# Altium PCB rev-b1_pod_Pod_PCB.PcbDoc
Units mm, origin at the board's own origin, x right, y up, seen from the top; angles counter-clockwise.
Board outline 40.7 x 26.7 mm, 2 copper layers (Top Layer, Bottom Layer), stack 1.58 mm thick; 59 components, 49 nets, 246 pads, 1 vias.
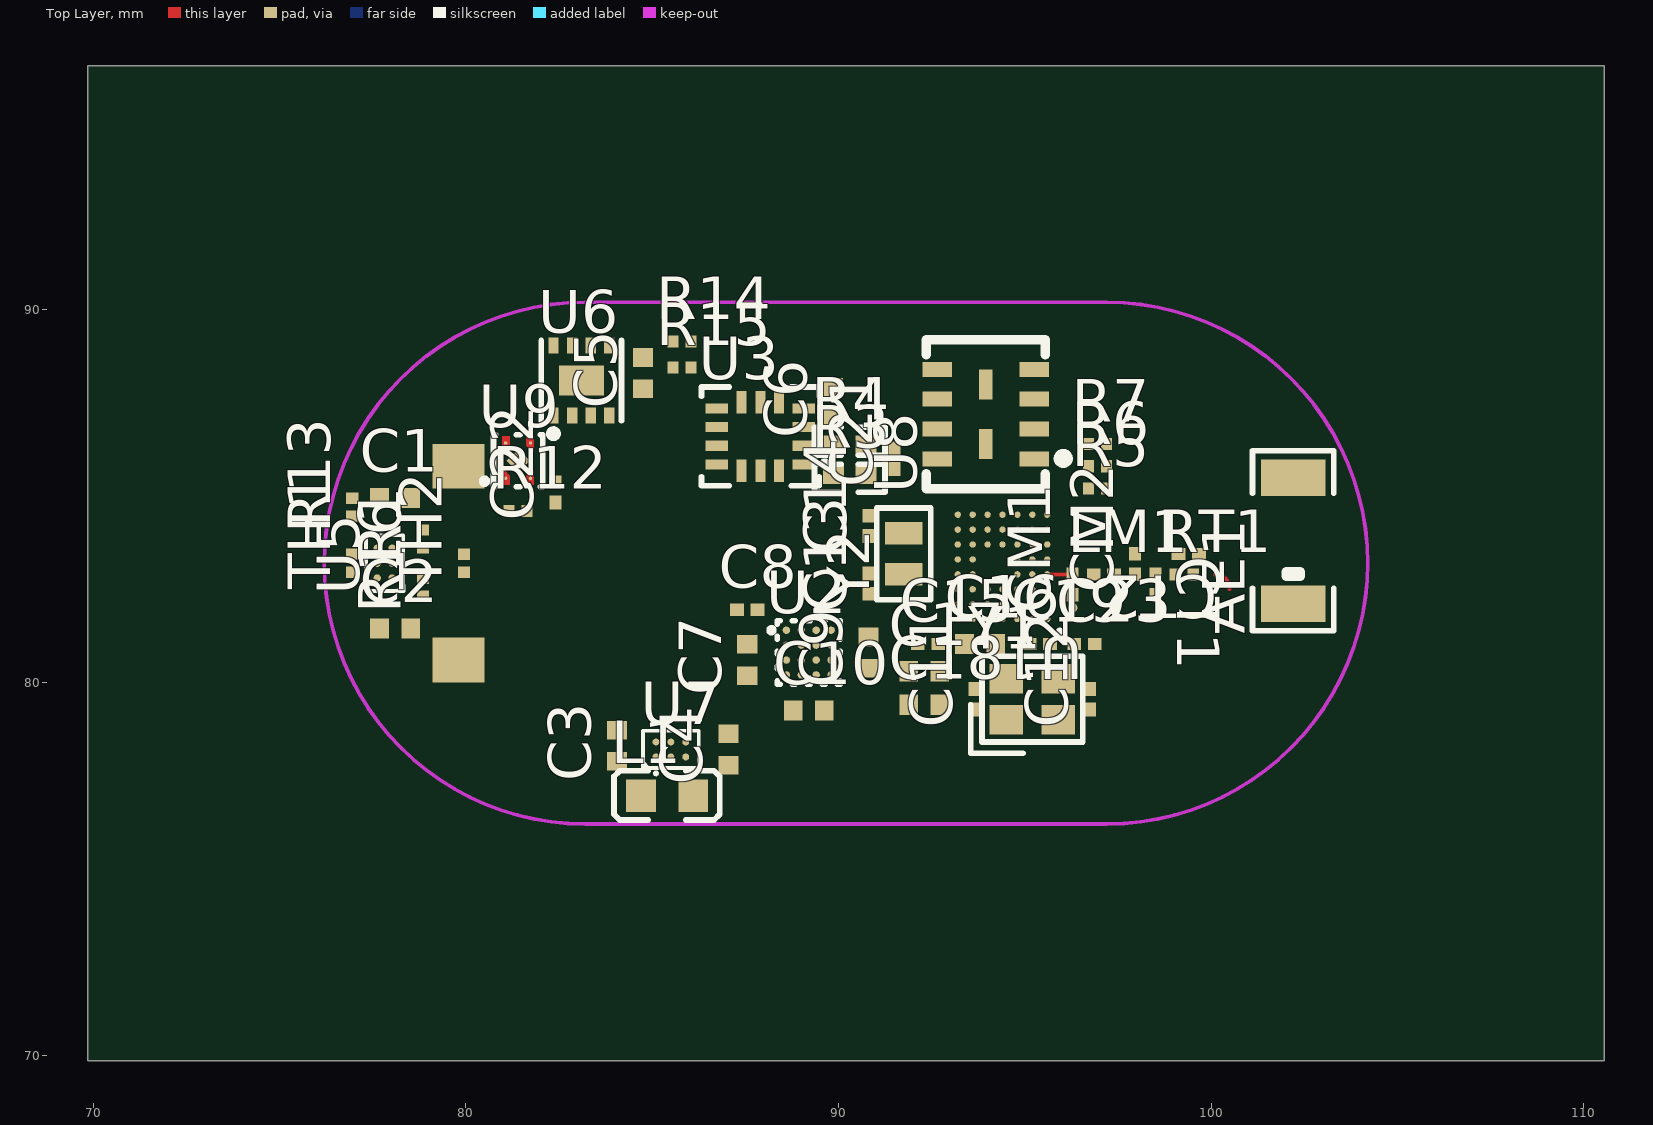
[diagram p0: Top Layer view]
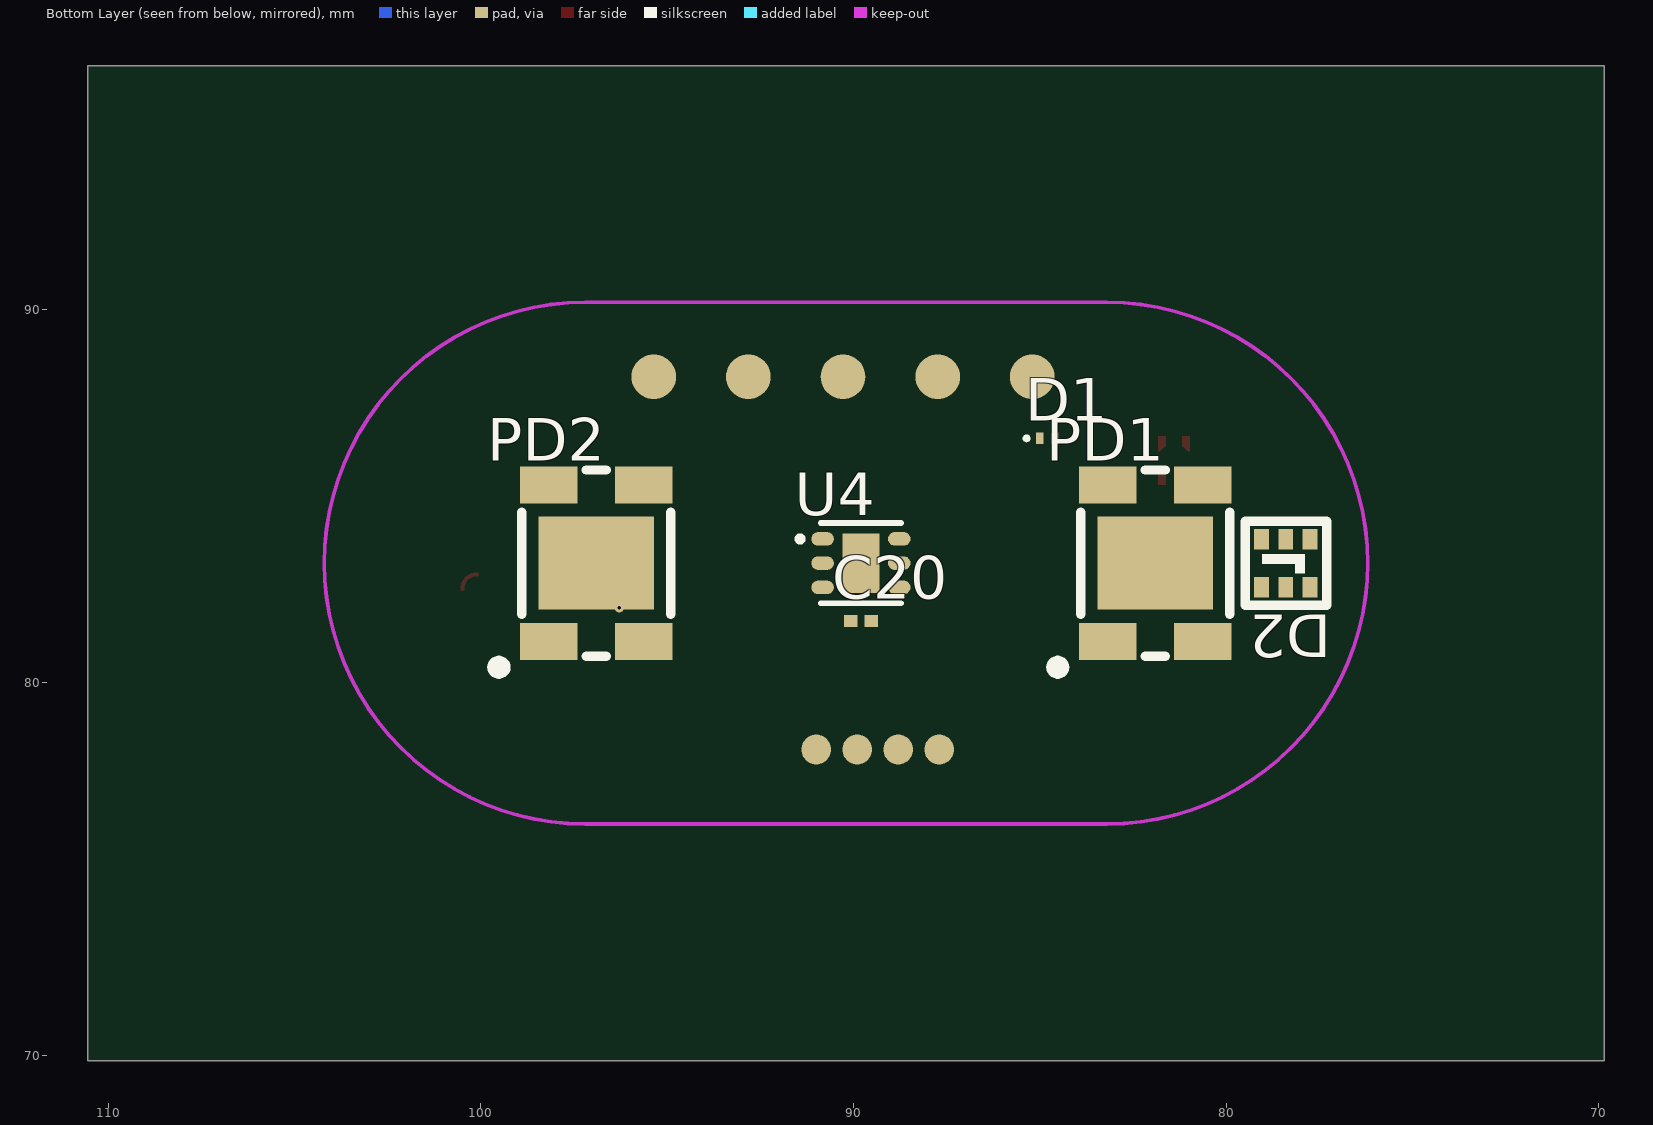
[diagram p1: Bottom Layer view, seen from below]

## Layer stack, top to bottom
Top Solder Mask Layer: solder mask 0.01, Dk 3.3
Top Layer: signal copper 0.035
Dielectric1: surface 1.51, FR4, Dk 4.5
Bottom Layer: signal copper 0.035
Bottom Solder Mask Layer: solder mask 0.01, Dk 3.3

## Board outline
110.55,69.85 69.85,69.85 69.85,96.55 110.55,96.55

## Design rules (kind name [scope] priority, off if disabled: settings)
BoardOutlineClearance copperThickness1oz [All] p0: genericclearance=0.254 ignorepadtopadclearanceinfootprint=FALSE except(0: Arc-SplitContinuation Track-SplitContinuation SMDPad-SplitContinuation THPad-SplitContinuation Via-SplitContinuation Fill-SplitContinuation Poly-SplitContinuation Region-SplitContinuation Text-SplitContinuation)
BoardOutlineClearance copperThickness2oz [All] p0: genericclearance=0.254 ignorepadtopadclearanceinfootprint=FALSE except(0: Arc-SplitContinuation Track-SplitContinuation SMDPad-SplitContinuation THPad-SplitContinuation Via-SplitContinuation Fill-SplitContinuation Poly-SplitContinuation Region-SplitContinuation Text-SplitContinuation)
BoardOutlineClearance otherClearance [All] p0: genericclearance=0.254 ignorepadtopadclearanceinfootprint=FALSE except(0: Arc-SplitContinuation Track-SplitContinuation SMDPad-SplitContinuation THPad-SplitContinuation Via-SplitContinuation Fill-SplitContinuation Poly-SplitContinuation Region-SplitContinuation Text-SplitContinuation)
Clearance copperThickness1oz [All] p1: gap=0.178 ignorepadtopadclearanceinfootprint=FALSE
Clearance copperThickness2oz [All] p1: gap=0.178 ignorepadtopadclearanceinfootprint=FALSE
Clearance otherClearance [All] p1: gap=0.178 ignorepadtopadclearanceinfootprint=FALSE
DiffPairsRouting differentialPair [All] p1: maxuncoupledlength=10 minlimit=6 maxlimit=Infinity mostfreqgap=6 toplayer_minwidth=5 toplayer_prefwidth=10 toplayer_maxwidth=100 bottomlayer_minwidth=5 bottomlayer_prefwidth=10 bottomlayer_maxwidth=100
PasteMaskExpansion pasteMaskExpansion [All] p1: expansion=0
PlaneConnect innerPlane [All] p1: planeconnectstyle=Relief reliefexpansion=0.508 reliefentries=4 reliefconductorwidth=0.254 reliefairgap=0.254
PolygonConnect copperRegion [All] p1: connectstyle=Relief reliefentries=4 reliefconductorwidth=10 polygonreliefangle="90 Angle" airgapwidth=10
RoutingVias viaSize [All] p1: viastyle="Through Hole" holewidth=5.9056 minholewidth=3.937 maxholewidth=248.0314 width=5.9056 minwidth=3.937 maxwidth=248.0314
SolderMaskExpansion solderMaskExpansion [IsVia] p1: useseparateexpansions=TRUE expansion=-1000 expansionbottom=-1000
SolderMaskExpansion solderMaskExpansion [All] p2: useseparateexpansions=TRUE expansion=2 expansionbottom=2
Width copperThickness1oz [All] p1: maxlimit=100 minlimit=3 preferedwidth=4
Width copperThickness2oz [All] p1: maxlimit=100 minlimit=8 preferedwidth=10

## Components (designator, comment, footprint, x,y, rotation, side; value= is the part's Value field where it differs from the comment)
AE1 "RFECA3216060A1T" ANT-SMD_L3.1-W1.6 102.2,83.8 r90 top
C1 "1uF" C0402 78.1,84.95 r0 top
C2 "4.7uF" C0402 78.1,81.45 r0 top
C3 "4.7uF" C0402 84.05,78.3 r90 top
C4 "10uF" C0402 87.05,78.2 r90 top
C5 "1uF" C0402 84.75,88.3 r90 top
C6 "100nF" C0402 89.85,87.5 r90 top
C7 "10uF" C0402 87.55,80.6 r90 top
C8 "100nF" C0201 87.55,81.95 r0 top
C9 "1uF" C0402 90.8,80.8 r90 top
C10 "1uF" C0402 89.2,79.25 r0 top
C11 "12pF" C0201 93.65,79.55 r90 top
C12 "12pF" C0201 96.75,79.55 r90 top
C13 "10pF" C0201 90.8,82.65 r90 top
C14 "10pF" C0201 90.8,84.2 r90 top
C15 "100nF" C0201 92.4,81.03 r0 top
C16 "1uF" C0402 93.8,81.03 r0 top
C17 "100nF" C0402 92.3,80.3 r0 top
C18 "4.7uF" C0402 92.3,79.4 r0 top
C19 "100pF" C0201 95.4,81.03 r0 top
C20 "100nF" C0201 89.8,81.65 r180 bottom
C21 "100nF" C0201 91.5,86 r90 top
C22 "100nF" C0201 82.4,85.1 r90 top
C23 "100pF" C0201 96.6,81.03 r0 top
CM1 "1pF" C0201 96.28,82.625 r90 top
CM2 "0.5pF" C0201 97.96,83.175 r90 top
CT1 "0.5pF" C0201 98.5,82.625 r270 top
CT2 "0.5pF" C0201 99.4,83.45 r180 top
D1 "ESD5V3U04-0201" X3-DFN0603-2_L0.6-W0.3-RD 84.8,86.55 r180 bottom
D2 "SFH 7016" LED-ARRAY-SMD_L1.9-W1.7_SFH-7016 78.4,83.2 r0 bottom
L1 "2.2uH" IND-SMD_L1.6-W0.8-1 85.4,76.96 r0 top
LM1 "3.3nH" L0201-RD 97.12,82.9 r0 top
PD1 "VEMD5080X01" SENSOR-SMD_VEMD5080X01 81.9,83.2 r180 bottom
PD2 "VEMD5080X01" SENSOR-SMD_VEMD5080X01 96.9,83.2 r180 bottom
R1 "6.04kΩ" R0201 78.85,83.85 r90 top
R3 "4.7kΩ" R0402 90.3,85.6 r0 top
R4 "4.7kΩ" R0402 90.3,86.35 r0 top
R5 "100Ω" R0201 96.95,85.2 r0 top
R6 "100Ω" R0201 96.95,85.8 r0 top
R7 "100Ω" R0201 96.95,86.4 r0 top
R12 "1kΩ" R0201 81.4,84.6 r0 top
R13 "10kΩ" R0201 76.95,84.7 r90 top
R14 "1MΩ" R0201 85.8,89.15 r0 top
R15 "470kΩ" R0201 85.8,88.45 r0 top
R16 "1kΩ" R0201 78.85,82.55 r90 top
RT1 "0Ω" R0201 99.28,82.9 r0 top
TH1 "NCP03XH103F05RL" R0201 76.95,83.2 r90 top
TH2 "NCP03XH103F05RL" R0201 79.95,83.2 r90 top
U1 "NRF52832-CIAA-R" WLCSP-50_L3.2-W3.0-TL_NRF52832 94.4,83.1 r180 top
U2 "MAX86174AENE+T" DSBGA-16_L1.7-W1.7-R4-C4-P0.40-TL 89.2,80.8 r0 top
U3 "LSM6DSV16XTR" LGA-14_L3.0-W2.5-P0.50-BR 87.9,86.6 r0 top
U4 "TMP117AIDRVR" WSON-6_L2.0-W2.0-P0.65-TL-EP 89.8,83.2 r180 bottom
U5 "BQ25101YFPR" DSBGA-6_L0.9-W1.6-R2-C3-P0.40-BL 77.82,83.2 r90 top
U6 "MAX17048G+T10" TDFN-8_L2.0-W2.0-P0.50-BL-EP1.2 83.1,88.1 r0 top
U7 "TPS62840YBGR" DSBGA-6_L1.4-W1.0-R2-C3-P0.40-BL 85.5,78.2 r0 top
U8 "W25Q64JWUUIQ" USON-8_L4.0-W3.0-P0.80-BL_WINBOND_UU 93.95,87.2 r90 top
U9 "LPB1010HQVF" XDFN-4_L1.0-W1.0-P0.65-BL-EP 81.4,85.95 r0 top
Y1 "32MHz" CRYSTAL-SMD_4P-L2.0-W1.6-BL 95.2,79.55 r0 top
Y2 "32.768kHz" CRYSTAL-SMD_L1.6-W1.0 91.75,83.45 r90 top

## Footprints (in the part's own frame and the unit in brackets; to place one, negate y for a bottom-side part, rotate by r counter-clockwise, add the part's x,y. Pads: shape width x height; smd on the part's side, far side on the other; paste and mask are expansions set on the pad)
ANT-SMD_L3.1-W1.6 [mm]
  rect 0.984x1.728 smd paste-100 mask+0.051: 1(-1.692,0) 2(1.692,0)
  silkscreen extent -2.41,-1.09 2.41,1.09
C0201 [mm]
  rect 0.368x0.324 smd paste-100 mask+0.051: 1(-0.274,0) 2(0.274,0)
C0402 [mm]
  rect 0.5x0.54 smd paste+0 mask+0.051: 1(-0.42,0) 2(0.42,0)
CRYSTAL-SMD_4P-L2.0-W1.6-BL [mm]
  rect 0.9x0.8 smd: 1(-0.7,-0.55) 2(0.7,-0.55) 3(0.7,0.55) 4(-0.7,0.55)
  silkscreen extent -1.65,-1.45 1.35,1.15
CRYSTAL-SMD_L1.6-W1.0 [mm]
  rect 0.6x1 smd paste+0 mask+0.051: 1(-0.55,0) 2(0.55,0)
  silkscreen extent -1.23,-0.73 1.23,0.73
DSBGA-6_L0.9-W1.6-R2-C3-P0.40-BL [mm]
  round 0.2 smd paste-100 mask+0.051: A1(-0.4,-0.2) A2(-0.4,0.2) B1(0,-0.2) B2(0,0.2) C1(0.4,-0.2) C2(0.4,0.2)
  silkscreen extent -0.75,-0.5 0.75,0.5
DSBGA-6_L1.4-W1.0-R2-C3-P0.40-BL [mm]
  round 0.185 smd paste+0 mask+0.05: A1(-0.4,-0.2) A2(-0.4,0.2) B1(0,-0.2) B2(0,0.2) C1(0.4,-0.2) C2(0.4,0.2)
  silkscreen extent -0.75,-0.68 0.75,0.5
DSBGA-16_L1.7-W1.7-R4-C4-P0.40-TL [mm]
  round 0.2 smd paste-100 mask+0.05: A1(-0.6,0.6) A2(-0.2,0.6) A3(0.2,0.6) A4(0.6,0.6) B1(-0.6,0.2) B2(-0.2,0.2) B3(0.2,0.2) B4(0.6,0.2) C1(-0.6,-0.2) C2(-0.2,-0.2) C3(0.2,-0.2) C4(0.6,-0.2) D1(-0.6,-0.6) D2(-0.2,-0.6) D3(0.2,-0.6) D4(0.6,-0.6)
  silkscreen extent -1.06,-0.85 0.85,0.85
IND-SMD_L1.6-W0.8-1 [mm]
  rect 0.8x0.864 smd: 1(0.7,0) 2(-0.7,0)
  silkscreen extent -1.42,-0.65 1.41,0.67
L0201-RD [mm]
  rect 0.368x0.324 smd paste-100 mask+0.051: 1(-0.274,0) 2(0.274,0)
LED-ARRAY-SMD_L1.9-W1.7_SFH-7016 [mm]
  rect 0.4x0.55 smd paste+0 mask+0.05: 1(0.65,0.645) 2(0.65,-0.645) 3(0,0.645) 4(0,-0.645) 5(-0.65,0.645) 6(-0.65,-0.645)
  silkscreen extent -1.09,-1.13 1.09,1.13
LGA-14_L3.0-W2.5-P0.50-BR [mm]
  rect 0.6x0.27 smd: 1(1.17,-0.75) 2(1.17,-0.25) 3(1.17,0.25) 4(1.17,0.75) 8(-1.17,0.75) 9(-1.17,0.25) 10(-1.17,-0.25) 11(-1.17,-0.75)
  rect 0.27x0.6 smd: 5(0.5,0.92) 6(0,0.92) 7(-0.5,0.92) 12(-0.5,-0.92) 13(0,-0.92) 14(0.5,-0.92)
  silkscreen extent -1.58,-1.33 1.8,1.33
R0201 [mm]
  rect 0.303x0.324 smd paste-100 mask+0.051: 1(-0.242,0) 2(0.242,0)
R0402 [mm]
  rect 0.566x0.54 smd paste-100 mask+0.051: 1(-0.433,0) 2(0.433,0)
  silkscreen extent -0.94,-0.5 0.94,0.5
SENSOR-SMD_VEMD5080X01 [mm]
  rect 1.55x1 smd: 1(-1.275,-2.1) 2(1.275,-2.1) 3(1.275,2.1) 4(-1.275,2.1)
  rect 3.1x2.5 smd: 5(0,0)
  silkscreen extent -2.92,-3.1 2,2.5
TDFN-8_L2.0-W2.0-P0.50-BL-EP1.2 [mm]
  rect 0.28x0.425 smd: 1(-0.75,-0.938) 2(-0.25,-0.938) 3(0.25,-0.938) 4(0.75,-0.938) 5(0.75,0.938) 6(0.25,0.938) 7(-0.25,0.938) 8(-0.75,0.938)
  rect 1.2x0.8 smd: 9(0,0)
  silkscreen extent -1.08,-1.53 1.08,1.08
USON-8_L4.0-W3.0-P0.80-BL_WINBOND_UU [mm]
  rect 0.4x0.8 smd: 1(-1.2,-1.3) 2(-0.4,-1.3) 3(0.4,-1.3) 4(1.2,-1.3) 5(1.2,1.3) 6(0.4,1.3) 7(-0.4,1.3) 8(-1.2,1.3)
  rect 0.8x0.35 smd: 9(-0.802,0) 10(0.798,0)
  silkscreen extent -2,-2.21 2,1.6
WLCSP-50_L3.2-W3.0-TL_NRF52832 [mm]
  round 0.17 smd paste-100 mask+0.051: A1(-1.2,1.4) A2(-0.8,1.4) A3(-0.4,1.4) A4(0,1.4) A5(0.4,1.4) A6(0.8,1.4) A7(1.2,1.4) B2(-0.8,1) B3(-0.4,1) B4(0,1) B5(0.4,1) B6(0.8,1) B7(1.2,1) C2(-0.8,0.6) C3(-0.4,0.6) C4(0,0.6) C5(0.4,0.6) C6(0.8,0.6) C7(1.2,0.6) D1(-1.2,0.2) D2(-0.8,0.2) D3(-0.4,0.2) D6(0.8,0.2) D7(1.2,0.2) E1(-1.2,-0.2) E2(-0.8,-0.2) E3(-0.4,-0.2) E6(0.8,-0.2) E7(1.2,-0.2) F1(-1.2,-0.6) F2(-0.8,-0.6) F3(-0.4,-0.6) F4(0,-0.6) F5(0.4,-0.6) F6(0.8,-0.6) F7(1.2,-0.6) G1(-1.2,-1) G2(-0.8,-1) G3(-0.4,-1) G4(0,-1) G5(0.4,-1) G6(0.8,-1) G7(1.2,-1) H1(-1.2,-1.4) H2(-0.8,-1.4) H3(-0.4,-1.4) H4(0,-1.4) H5(0.4,-1.4) H6(0.8,-1.4) H7(1.2,-1.4)
  silkscreen extent -1.64,1.64 -1.44,1.84
WSON-6_L2.0-W2.0-P0.65-TL-EP [mm]
  oval 0.607x0.364 smd: 1(-1.028,0.65) 2(-1.028,0) 3(-1.028,-0.65) 4(1.028,-0.65) 5(1.028,0) 6(1.028,0.65)
  rect 1x1.6 smd: 7(0,0)
  silkscreen extent -1.71,-1.08 1.08,1.08
X3-DFN0603-2_L0.6-W0.3-RD [mm]
  rect 0.2x0.3 smd: 1(-0.2,0) 2(0.2,0)
  silkscreen extent -0.66,-0.1 -0.45,0.1
XDFN-4_L1.0-W1.0-P0.65-BL-EP [mm]
  round 0.09 smd: 1(-0.335,-0.47)
  round 0.092 smd: 2(0.333,-0.475) 3(0.333,0.475) 4(-0.333,0.475)
  rect 0.45x0.45 smd rot 45: 5(0,0)
  Top Layer region: 0.425,-0.65 0.225,-0.65 0.225,-0.4 0.375,-0.25 0.425,-0.25
  Top Layer region: -0.425,0.65 -0.225,0.65 -0.225,0.4 -0.375,0.25 -0.425,0.25
  Top Layer region: 0.425,0.65 0.225,0.65 0.225,0.4 0.375,0.25 0.425,0.25
  Top Layer region: -0.225,-0.4 -0.225,-0.65 -0.425,-0.65 -0.425,-0.2 -0.375,-0.25
  silkscreen extent -0.98,-0.7 0.66,0.7

## Free pads (board coordinates)
  rect 1.4x1.2 smd: BT1(79.8,80.6) BT2(79.8,85.8)
  round 1.2 smd far side: J1(85.2,88.2) J2(87.74,88.2) J3(90.28,88.2) J4(92.82,88.2) J5(95.36,88.2)
  round 0.8 smd far side: TP1(87.7,78.2) TP2(88.8,78.2) TP3(89.9,78.2) TP4(91,78.2)

## Via types
v1: diameter 0.25, hole 0.099, Top Layer to Inner1, 1 vias

## Nets (pads, with @x,y where several pads share a name; then routed paths per layer and width w, separated by ;. In a path a pad name is that pad's centre, name@x,y a point inside that pad or via, vN(x,y) a via of type N, cw(c..) or ccw(c..) an arc to the next point about the centre after c; other vN are vias at no path point)
ANT: CM1.2 LM1.1 U1.D1 | length 0.7
  Top Layer w0.106: U1.D1 CM1.2
BATN: C22.2 pad.BT2 pad.TP3 U9.2 U9.5
CHG_INH: R16.1 U1.G7
CHRG_N: U1.B5 U5.C1
DEC1: C15.2 U1.B7
DEC2: C23.1 U1.A2
DEC3: C19.1 U1.C2
DEC4: C16.1 U1.A6
FG_ALRT: U1.A4 U6.5
FL_CS: U1.H6 U8.1
FL_MISO: U1.H4 U8.2
FL_MOSI: U1.H5 U8.5
FL_SCK: U1.G4 U8.6
GND: AE1.2 C1.2 C2.2 C3.2 C4.2 C5.2 C6.2 C7.2 C8.1 C9.2 C10.2 C11.2 C12.2 C13.2 C14.2 C15.1 C16.2 C17.2 C18.2 C19.2 C20.1 C21.1 C23.2 CM1.1 CM2.2 CT1.2 CT2.2 D1.2 pad.J2 PD1.1 PD2.1 R1.2 R15.2 TH1.2 TH2.2 U1.C4 U1.C5 U1.D2 U1.E3 U1.F5 U2.A1 U2.C2 U2.C3 U3.1 U3.2 U3.3 U3.6 U3.7 U4.2 U4.4 U4.7 U5.C2 U6.1 U6.4 U6.6 U6.9 U7.A1 U7.C2 U8.4 U8.9 U8.10 U9.4 Y1.2 Y1.4
  other v1: 96.281,82
IMU_INT1: U1.A3 U3.4
IMU_INT2: U1.F4 U3.9
ISET: R1.1 U5.B2
LED_G: D2.3 U2.C1
LED_IR: D2.1 U2.D2
LED_R: D2.4 U2.D1
NRESET: R7.1 U1.H1
NRESET_P: pad.J5 R7.2
NTC_PWR: R13.1 U1.E6
NTC_SENSE: R13.2 TH1.1 U1.D6
PD1_K: PD1.3 PD1.4 PD1.5 U2.A4
PD2_K: PD2.3 PD2.4 PD2.5 U2.A3
PPG_INT: U1.B3 U2.B2
PROT_VDD: C22.1 R12.2 U9.1
RF1: CM2.1 CT1.1 LM1.2 RT1.1
RF2: AE1.1 CT2.1 RT1.2 | length 0.6
  Top Layer w0.106: 100.1,82.901 cw(c100.1,82.505) 100.496,82.505
SCL: R4.1 U1.F6 U2.D4 U3.13 U4.1 U6.7
SDA: R3.1 U1.F7 U2.D3 U3.14 U4.6 U6.8
SHIP: pad.TP4 U1.E7 U9.3
SW: L1.1 U7.B2
SWCLK: R6.1 U1.F1
SWCLK_P: pad.J3 R6.2
SWDIO: R5.1 U1.G1
SWDIO_P: pad.J4 R5.2
TMP_ALERT: U1.A5 U4.3
TS: R16.2 TH2.1 U5.B1
V1V8: C4.1 C6.1 C9.1 C17.1 C18.1 C20.2 C21.2 L1.2 pad.TP2 R3.2 R4.2 U1.A7 U1.H7 U2.A2 U2.B4 U2.C4 U3.5 U3.8 U3.12 U4.5 U7.A2 U8.3 U8.7 U8.8
VBAT: C2.1 C3.1 C5.1 C7.1 C8.2 D2.2 D2.5 pad.BT1 pad.TP1 R12.1 U2.B3 U5.A1 U6.2 U6.3 U7.B1 U7.C1
VBUS: C1.1 D1.1 pad.J1 R14.1 U5.A2
VBUS_SENSE: R14.2 R15.1 U1.C6
VREF: C10.1 U2.B1
XC1: C11.1 U1.B2 Y1.1
XC2: C12.1 U1.A1 Y1.3
XL1: C13.1 U1.D7 Y2.1
XL2: C14.1 U1.C7 Y2.2
pads on no net: D2.6 PD1.2 PD2.2 U1.B4 U1.B6 U1.C3 U1.D3 U1.E1 U1.E2 U1.F2 U1.F3 U1.G2 U1.G3 U1.G5 U1.G6 U1.H2 U1.H3 U3.10 U3.11

## Keep-outs
Board Outline Layer:
  lines w0.1: 83.2,76.2 cw(c83.2,83.2) 83.2,90.2 97.2,90.2 cw(c97.2,83.2) 97.2,76.2 83.2,76.2